# Altium PCB EVT_SYS_CARRIER.PcbDoc
Units mil, origin at the board's own origin, x right, y up, seen from the top; angles counter-clockwise.
Board outline 6000 x 4000 mil, 2 copper layers (Top Layer, Bottom Layer); 92 components, 48 nets, 525 pads, 0 vias.
Unrouted connection lines stored in the file: 100.
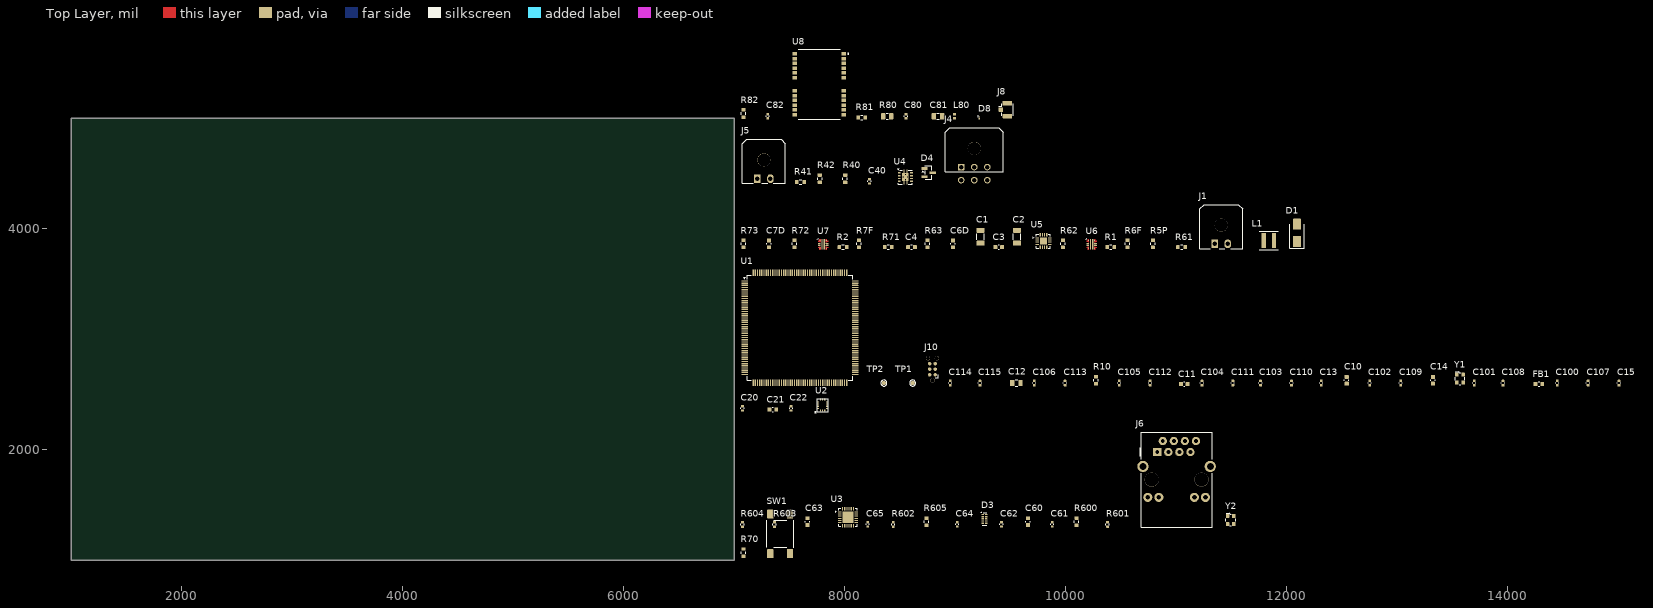
[diagram p0: Top Layer view]
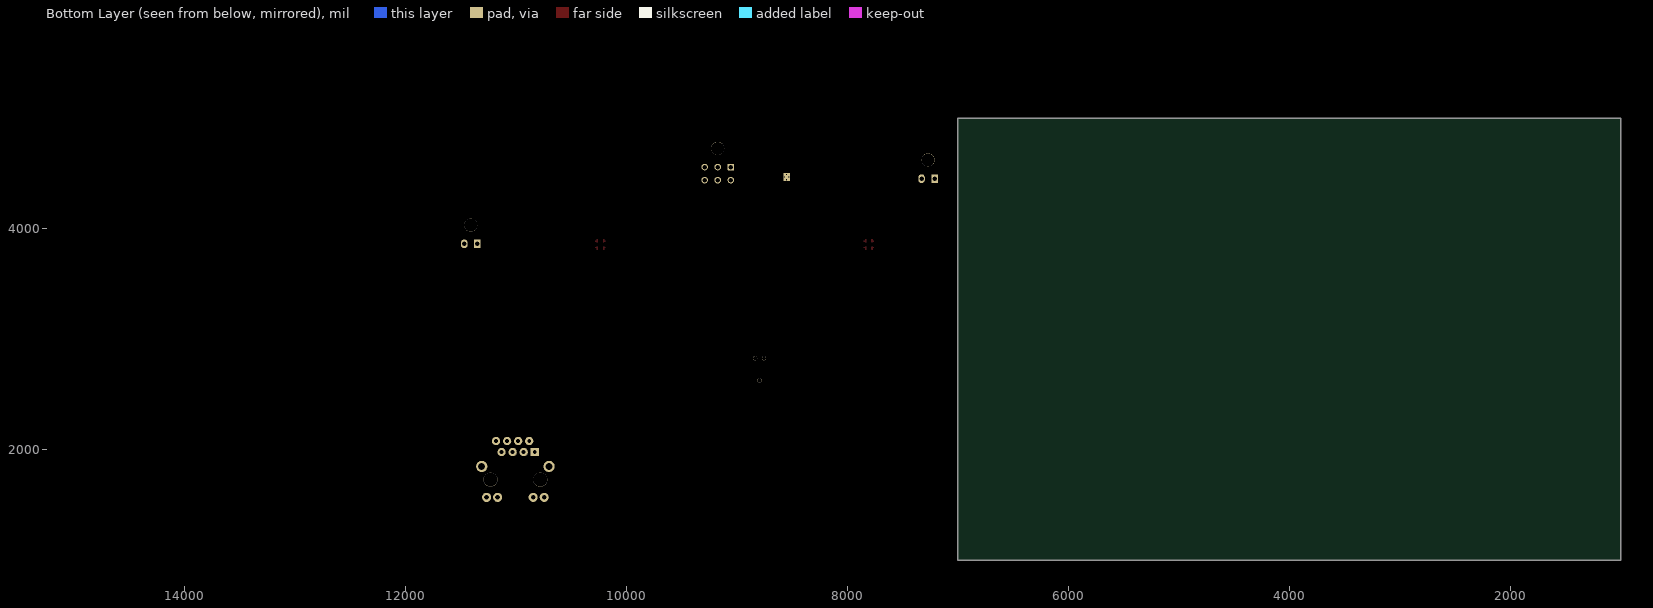
[diagram p1: Bottom Layer view, seen from below]

## Layer stack, top to bottom
Top Solder: solder mask 0.4, Solder Resist, Dk 3.5
Top Layer: signal copper 1.4
Dielectric 1: dielectric 12.6, FR-4, Dk 4.8
Bottom Layer: signal copper 1.4
Bottom Solder: solder mask 0.4, Solder Resist, Dk 3.5

## Board outline
1000,1000 7000,1000 7000,5000 1000,5000

## Design rules (kind name [scope] priority, off if disabled: settings)
Clearance [All] p1: gap=10 ignorepadtopadclearanceinfootprint=FALSE
PolygonConnect [All] p1: connectstyle=Relief reliefconductorwidth=10 reliefentries=4 polygonreliefangle="90 Angle" airgapwidth=10
RoutingVias [All] p1: holewidth=28 width=50 viastyle="Through Hole" minholewidth=28 minwidth=50 maxholewidth=28 maxwidth=50
SolderMaskExpansion [All] p1: expansion=0 istentingtop=FALSE
Width [All] p1: maxlimit=10 minlimit=10 preferedwidth=10
30 further rules are at their usual default settings.

## Classes and differential pairs
component class TIME_GNSS: C80 C81 C82 D8 J8 L80 R80 R81 R82 U8
component class RADAR_IO_CAN: C40 D4 J4 J5 R40 R41 R42 U4
component class POWER_INPUT: C1 C2 C3 C4 C6D C7D D1 J1 L1 R1 R2 R5P R6F R7F R61 R62 R63 R71 R72 R73 U5 U6 U7
component class MCU_CORE: C10 C11 C12 C13 C14 C15 C100 C101 C102 C103 C104 C105 C106 C107 C108 C109 C110 C111 C112 C113 C114 C115 FB1 J10 R10 TP1 TP2 U1 Y1
component class IMU: C20 C21 C22 U2
component class ETHERNET: C60 C61 C62 C63 C64 C65 D3 J6 R600 R601 R602 R603 R604 R605 U3 Y2
component class DEBUG_BOOT: R70 SW1

## Components (designator, comment, footprint, x,y, rotation, side; value= is the part's Value field where it differs from the comment)
C1 "10uF/25V" C_1206_3216Metric 9230,3930 r90 top
C2 "22uF/6.3V" C_1206_3216Metric 9560,3930 r90 top
C3 "3.3nF" C_0603_1608Metric 9395,3835 r0 top
C4 "100nF/25V" C_0603_1608Metric 8605,3835 r0 top
C6D "3.3nF" C_0603_1608Metric 8980,3865 r90 top
C7D "3.3nF" C_0603_1608Metric 7315,3865 r90 top
C10 "2.2uF" C_0603_1608Metric 12545,2630 r90 top
C11 "2.2uF" C_0603_1608Metric 11075,2595 r0 top
C12 "4.7uF" C_0805_2012Metric 9555,2605 r0 top
C13 "100nF" C_0402_1005Metric 12315,2605 r90 top
C14 "1uF" C_0603_1608Metric 13325,2630 r90 top
C15 "100nF" C_0402_1005Metric 15010,2605 r90 top
C20 "100nF" C_0402_1005Metric 7075,2375 r90 top
C21 "2.2uF" C_0603_1608Metric 7350,2365 r0 top
C22 "10nF" C_0402_1005Metric 7515,2375 r90 top
C40 "100nF" C_0402_1005Metric 8225,4430 r90 top
C60 "1uF" C_0603_1608Metric 9660,1350 r90 top
C61 "470pF C0G" C_0402_1005Metric 9880,1325 r90 top
C62 "100nF" C_0402_1005Metric 9420,1325 r90 top
C63 "22nF C0G" C_0603_1608Metric 7665,1350 r90 top
C64 "100nF" C_0402_1005Metric 9020,1325 r90 top
C65 "100nF" C_0402_1005Metric 8210,1325 r90 top
C80 "100nF" C_0402_1005Metric 8555,5020 r90 top
C81 "10uF" C_0805_2012Metric 8845,5020 r0 top
C82 "100nF DNP_OPTION" C_0402_1005Metric 7305,5020 r90 top
C100 "100nF VDD" C_0402_1005Metric 14450,2605 r90 top
C101 "100nF VDD" C_0402_1005Metric 13700,2605 r90 top
C102 "100nF VDD" C_0402_1005Metric 12755,2605 r90 top
C103 "100nF VDD" C_0402_1005Metric 11765,2605 r90 top
C104 "100nF VDD" C_0402_1005Metric 11235,2605 r90 top
C105 "100nF VDD" C_0402_1005Metric 10485,2605 r90 top
C106 "100nF VDD" C_0402_1005Metric 9715,2605 r90 top
C107 "100nF VDD" C_0402_1005Metric 14730,2605 r90 top
C108 "100nF VDD" C_0402_1005Metric 13960,2605 r90 top
C109 "100nF VDD" C_0402_1005Metric 13035,2605 r90 top
C110 "100nF VDD" C_0402_1005Metric 12045,2605 r90 top
C111 "100nF VDD" C_0402_1005Metric 11515,2605 r90 top
C112 "100nF VDD" C_0402_1005Metric 10765,2605 r90 top
C113 "100nF VDD" C_0402_1005Metric 9995,2605 r90 top
C114 "100nF VDD33_USB" C_0402_1005Metric 8955,2605 r90 top
C115 "100nF NRST" C_0402_1005Metric 9225,2605 r90 top
D1 "SMAJ15CA" D_SMA 12095,3965 r90 top
D3 "TPD4E05U06DQAR" USON-10_2.5x1.0mm_P0.5mm 9265,1375 r0 top
D4 "ESD2CANFD24-Q1" SOT-23 8760,4510 r0 top
D8 "ESD0P2RF-02LS" ESD0P2RF-02LS_PG-TSSLP-2-1 9220,5005 r0 top
FB1 "BLM18BD601SH1" L_0603_1608Metric 14285,2595 r0 top
J1 "12V_IN" Molex_43650-0200_RA_THT_2P 11350,3865 r0 top
J4 "RADAR_IO" Molex_43045-0600_RA_THT_6P 9055,4560 r0 top
J5 "RADAR_PWR" Molex_43650-0200_RA_THT_2P 7210,4455 r0 top
J6 "SI-60182-F" RJ45_Bel_SI-60062-F 10830,1980 r0 top
J8 "GNSS_UFL" Hirose_UFL_R_SMT_K 9455,5080 r0 top
J10 "TC2030_SWD" TagConnect_TC2030_NL 8795,2730 r90 top
L1 "2.2uH" Coilcraft_XFL4020_4x4 11840,3895 r0 top
L80 "27nH DNP_OPTION" L_0402_1005Metric 8995,5020 r90 top
R1 "665R 1%" R_0603_1608Metric 10410,3835 r0 top
R2 "1.05k 1%" R_0603_1608Metric 7985,3835 r0 top
R5P "100k 1% PG_PU" R_0603_1608Metric 10790,3865 r90 top
R6F "10k 1% FLT_PU" R_0603_1608Metric 10560,3865 r90 top
R7F "10k 1% FLT_PU" R_0603_1608Metric 8130,3865 r90 top
R10 "10k 1%" R_0603_1608Metric 10275,2630 r90 top
R40 "120R 1% DNP_DEFAULT" R_0603_1608Metric 8005,4455 r90 top
R41 "10k 1% STB_PD" R_0603_1608Metric 7600,4425 r0 top
R42 "10k 1% SHDN_PD" R_0603_1608Metric 7775,4455 r90 top
R61 "470k 1%" R_0603_1608Metric 11050,3835 r0 top
R62 "36.0k 1%" R_0603_1608Metric 9975,3865 r90 top
R63 "41.2k 1%" R_0603_1608Metric 8750,3865 r90 top
R70 "0R DNP_BOOT_OVERRIDE" R_0603_1608Metric 7085,1070 r90 top
R71 "470k 1%" R_0603_1608Metric 8395,3835 r0 top
R72 "16.9k 1%" R_0603_1608Metric 7545,3865 r90 top
R73 "43.7k 1%" R_0603_1608Metric 7085,3865 r90 top
R80 "10R 0.25W DNP_OPTION" R_0805_2012Metric 8385,5020 r0 top
R81 "100k 1% VUSB_PD" R_0603_1608Metric 8155,5010 r0 top
R82 "0R V_BCKP" R_0603_1608Metric 7085,5045 r90 top
R600 "12.1k 1%" R_0603_1608Metric 10100,1350 r90 top
R601 "49.9R 1%" R_0402_1005Metric 10380,1325 r90 top
R602 "49.9R 1%" R_0402_1005Metric 8440,1325 r90 top
R603 "49.9R 1%" R_0402_1005Metric 7365,1325 r90 top
R604 "49.9R 1%" R_0402_1005Metric 7075,1325 r90 top
R605 "10k 1% NRST_PD" R_0603_1608Metric 8740,1350 r90 top
SW1 "NRST" ESwitch_TL3301_GullWing_6x6 7415,1240 r90 top
TP1 "DEBUG_TX" TestPoint_Pad_D1.0mm 8615,2605 r0 top
TP2 "DEBUG_RX" TestPoint_Pad_D1.0mm 8355,2605 r0 top
U1 "STM32H753IIT6" LQFP-176_24x24mm_P0.5mm 7595,3105 r0 top
U2 "ICM-42688-P" ICM-42688-P_LGA14_2.5x3mm_P0.5mm 7800,2405 r0 top
U3 "LAN8742Ai-CZ-TR" QFN-24-1EP_4x4mm_P0.5mm_EP2.6x2.6mm 8030,1390 r0 top
U4 "TCAN3404DRBRQ1" Texas_DRB0008A 8550,4470 r0 top
U5 "TPS62132RGTR_3V3" VQFN-16-1EP_3x3mm_P0.5mm_EP1.68x1.68mm 9800,3890 r0 top
U6 "TPS259470ARPWR_SYS" TPS259470A_RPW0010A_VQFN-HR-10_2x2mm_P0.475mm 10235,3860 r0 top
U7 "TPS259470ARPWR_RADAR" TPS259470A_RPW0010A_VQFN-HR-10_2x2mm_P0.475mm 7805,3860 r0 top
U8 "NEO-M9N-00B" NEO-M9N_LCC24_12.2x16mm 7770,5310 r0 top
Y1 "ECS-2520S33-250-FN-TR" Oscillator_SMD_ECS_2520MV-xxx-xx-4Pin_2.5x2.0mm 13570,2645 r0 top
Y2 "ECS-2520S33-500-FN-TR" Oscillator_SMD_ECS_2520MV-xxx-xx-4Pin_2.5x2.0mm 11495,1365 r0 top

## Footprints (in the part's own frame and the unit in brackets; to place one, negate y for a bottom-side part, rotate by r counter-clockwise, add the part's x,y. Pads: shape width x height; smd on the part's side, far side on the other; paste and mask are expansions set on the pad)
C_0402_1005Metric [mm]
  rrect25% 0.56x0.62 smd: 1(-0.48,0) 2(0.48,0)
  silkscreen extent -0.11,-0.36 0.11,0.36
C_0603_1608Metric [mm]
  rrect25% 0.9x0.95 smd: 1(-0.775,0) 2(0.775,0)
  silkscreen extent -0.14,-0.51 0.14,0.51
C_0805_2012Metric [mm]
  rrect25% 1x1.45 smd: 1(-0.95,0) 2(0.95,0)
  silkscreen extent -0.26,-0.73 0.26,0.73
C_1206_3216Metric [mm]
  rrect22% 1.15x1.8 smd: 1(-1.475,0) 2(1.475,0)
  silkscreen extent -0.71,-0.91 0.71,0.91
Coilcraft_XFL4020_4x4 [mm]
  rect 0.98x3.4 smd: 1(-1.185,0) 2(1.185,0)
  silkscreen extent -2.15,-2.15 2.15,2.15
D_SMA [mm]
  rrect14% 2.5x1.8 smd: 1(-2,0) 2(2,0)
  silkscreen extent -3.51,-1.65 2,1.65
ESD0P2RF-02LS_PG-TSSLP-2-1 [mm]
  rect 0.32x0.24 smd: 1(0,0.19) 2(0,-0.19)
  silkscreen extent -0.4,0.32 -0.24,0.48
ESwitch_TL3301_GullWing_6x6 [mm]
  rrect18% 2.1x1.4 smd: 1(-4.55,2.25) 1(4.55,2.25) 2(-4.55,-2.25) 2(4.55,-2.25)
  silkscreen extent -3.1,-3.1 3.1,3.1
Hirose_UFL_R_SMT_K [mm]
  rrect25% 1.05x1 smd: 1(-1.05,0)
  rrect24% 2.2x1.05 smd: 2(0.475,-1.475) 2(0.475,1.475)
  silkscreen extent -1.52,-1.4 1.84,1.4
ICM-42688-P_LGA14_2.5x3mm_P0.5mm [mm]
  rect 0.475x0.25 smd: 1(-1.012,-0.75) 2(-1.012,-0.25) 3(-1.012,0.25) 4(-1.012,0.75) 8(1.012,0.75) 9(1.012,0.25) 10(1.012,-0.25) 11(1.012,-0.75)
  rect 0.25x0.475 smd: 5(-0.5,1.262) 6(0,1.262) 7(0.5,1.262) 12(0.5,-1.262) 13(0,-1.262) 14(-0.5,-1.262)
  silkscreen extent -1.8,-1.8 1.25,1.5
L_0402_1005Metric [mm]
  rrect25% 0.59x0.64 smd: 1(-0.485,0) 2(0.485,0)
L_0603_1608Metric [mm]
  rrect25% 0.875x0.95 smd: 1(-0.787,0) 2(0.787,0)
  silkscreen extent -0.16,-0.51 0.16,0.51
LQFP-176_24x24mm_P0.5mm [mm]
  rrect25% 1.5x0.3 smd: 1(-12.675,10.75) 2(-12.675,10.25) 3(-12.675,9.75) 4(-12.675,9.25) 5(-12.675,8.75) 6(-12.675,8.25) 7(-12.675,7.75) 8(-12.675,7.25) 9(-12.675,6.75) 10(-12.675,6.25) 11(-12.675,5.75) 12(-12.675,5.25) 13(-12.675,4.75) 14(-12.675,4.25) 15(-12.675,3.75) 16(-12.675,3.25) 17(-12.675,2.75) 18(-12.675,2.25) 19(-12.675,1.75) 20(-12.675,1.25) 21(-12.675,0.75) 22(-12.675,0.25) 23(-12.675,-0.25) 24(-12.675,-0.75) 25(-12.675,-1.25) 26(-12.675,-1.75) 27(-12.675,-2.25) 28(-12.675,-2.75) 29(-12.675,-3.25) 30(-12.675,-3.75) 31(-12.675,-4.25) 32(-12.675,-4.75) 33(-12.675,-5.25) 34(-12.675,-5.75) 35(-12.675,-6.25) 36(-12.675,-6.75) 37(-12.675,-7.25) 38(-12.675,-7.75) 39(-12.675,-8.25) 40(-12.675,-8.75) 41(-12.675,-9.25) 42(-12.675,-9.75) 43(-12.675,-10.25) 44(-12.675,-10.75) 89(12.675,-10.75) 90(12.675,-10.25) 91(12.675,-9.75) 92(12.675,-9.25) 93(12.675,-8.75) 94(12.675,-8.25) 95(12.675,-7.75) 96(12.675,-7.25) 97(12.675,-6.75) 98(12.675,-6.25) 99(12.675,-5.75) 100(12.675,-5.25) 101(12.675,-4.75) 102(12.675,-4.25) 103(12.675,-3.75) 104(12.675,-3.25) 105(12.675,-2.75) 106(12.675,-2.25) 107(12.675,-1.75) 108(12.675,-1.25) 109(12.675,-0.75) 110(12.675,-0.25) 111(12.675,0.25) 112(12.675,0.75) 113(12.675,1.25) 114(12.675,1.75) 115(12.675,2.25) 116(12.675,2.75) 117(12.675,3.25) 118(12.675,3.75) 119(12.675,4.25) 120(12.675,4.75) 121(12.675,5.25) 122(12.675,5.75) 123(12.675,6.25) 124(12.675,6.75) 125(12.675,7.25) 126(12.675,7.75) 127(12.675,8.25) 128(12.675,8.75) 129(12.675,9.25) 130(12.675,9.75) 131(12.675,10.25) 132(12.675,10.75)
  rrect25% 0.3x1.5 smd: 45(-10.75,-12.675) 46(-10.25,-12.675) 47(-9.75,-12.675) 48(-9.25,-12.675) 49(-8.75,-12.675) 50(-8.25,-12.675) 51(-7.75,-12.675) 52(-7.25,-12.675) 53(-6.75,-12.675) 54(-6.25,-12.675) 55(-5.75,-12.675) 56(-5.25,-12.675) 57(-4.75,-12.675) 58(-4.25,-12.675) 59(-3.75,-12.675) 60(-3.25,-12.675) 61(-2.75,-12.675) 62(-2.25,-12.675) 63(-1.75,-12.675) 64(-1.25,-12.675) 65(-0.75,-12.675) 66(-0.25,-12.675) 67(0.25,-12.675) 68(0.75,-12.675) 69(1.25,-12.675) 70(1.75,-12.675) 71(2.25,-12.675) 72(2.75,-12.675) 73(3.25,-12.675) 74(3.75,-12.675) 75(4.25,-12.675) 76(4.75,-12.675) 77(5.25,-12.675) 78(5.75,-12.675) 79(6.25,-12.675) 80(6.75,-12.675) 81(7.25,-12.675) 82(7.75,-12.675) 83(8.25,-12.675) 84(8.75,-12.675) 85(9.25,-12.675) 86(9.75,-12.675) 87(10.25,-12.675) 88(10.75,-12.675) 133(10.75,12.675) 134(10.25,12.675) 135(9.75,12.675) 136(9.25,12.675) 137(8.75,12.675) 138(8.25,12.675) 139(7.75,12.675) 140(7.25,12.675) 141(6.75,12.675) 142(6.25,12.675) 143(5.75,12.675) 144(5.25,12.675) 145(4.75,12.675) 146(4.25,12.675) 147(3.75,12.675) 148(3.25,12.675) 149(2.75,12.675) 150(2.25,12.675) 151(1.75,12.675) 152(1.25,12.675) 153(0.75,12.675) 154(0.25,12.675) 155(-0.25,12.675) 156(-0.75,12.675) 157(-1.25,12.675) 158(-1.75,12.675) 159(-2.25,12.675) 160(-2.75,12.675) 161(-3.25,12.675) 162(-3.75,12.675) 163(-4.25,12.675) 164(-4.75,12.675) 165(-5.25,12.675) 166(-5.75,12.675) 167(-6.25,12.675) 168(-6.75,12.675) 169(-7.25,12.675) 170(-7.75,12.675) 171(-8.25,12.675) 172(-8.75,12.675) 173(-9.25,12.675) 174(-9.75,12.675) 175(-10.25,12.675) 176(-10.75,12.675)
  silkscreen extent -13.09,-12.11 12.11,12.11
Molex_43045-0600_RA_THT_6P [mm]
  rrect17% 1.5x1.5 hole 1.02: 1(0,0)
  round 1.5 hole 1.02: 2(3,0) 3(6,0) 4(0,-3) 5(3,-3) 6(6,-3)
  round 3 hole 3: Un1(3,4.32)
  silkscreen extent -3.68,-1.1 9.68,9.03
Molex_43650-0200_RA_THT_2P [mm]
  rrect17% 1.5x2.02 hole 1.02: 1(0,0)
  rrect100% 1.5x2.02 hole 1.02: 2(3,0)
  round 3 hole 3: Un1(1.5,4.32)
  silkscreen extent -3.43,-1.09 6.44,9.03
NEO-M9N_LCC24_12.2x16mm [mm]
  rect 1x0.8 smd: 1(5.6,7) 2(5.6,5.9) 3(5.6,4.8) 4(5.6,3.7) 5(5.6,2.6) 6(5.6,1.5) 7(5.6,-1.5) 8(5.6,-2.6) 9(5.6,-3.7) 10(5.6,-4.8) 11(5.6,-5.9) 12(5.6,-7) 13(-5.6,-7) 14(-5.6,-5.9) 15(-5.6,-4.8) 16(-5.6,-3.7) 17(-5.6,-2.6) 18(-5.6,-1.5) 19(-5.6,1.5) 20(-5.6,2.6) 21(-5.6,3.7) 22(-5.6,4.8) 23(-5.6,5.9) 24(-5.6,7)
  silkscreen extent -4.8,-8 6.8,8
Oscillator_SMD_ECS_2520MV-xxx-xx-4Pin_2.5x2.0mm [mm]
  rrect25% 0.8x0.9 smd: 1(-0.725,0.925) 2(-0.725,-0.925) 3(0.725,-0.925) 4(0.725,0.925)
  silkscreen extent -1.11,-1.36 1.11,1.56
QFN-24-1EP_4x4mm_P0.5mm_EP2.6x2.6mm [mm]
  rrect25% 0.825x0.25 smd: 1(-1.937,1.25) 2(-1.937,0.75) 3(-1.937,0.25) 4(-1.937,-0.25) 5(-1.937,-0.75) 6(-1.937,-1.25) 13(1.937,-1.25) 14(1.937,-0.75) 15(1.937,-0.25) 16(1.937,0.25) 17(1.937,0.75) 18(1.937,1.25)
  rrect25% 0.25x0.825 smd: 7(-1.25,-1.937) 8(-0.75,-1.937) 9(-0.25,-1.937) 10(0.25,-1.937) 11(0.75,-1.937) 12(1.25,-1.937) 19(1.25,1.937) 20(0.75,1.937) 21(0.25,1.937) 22(-0.25,1.937) 23(-0.75,1.937) 24(-1.25,1.937)
  rect 2.6x2.6 smd: 25(0,0)
  rrect24% 1.05x1.05 on Top Paste: Un1(-0.65,0.65) Un2(-0.65,-0.65) Un3(0.65,0.65) Un4(0.65,-0.65)
  silkscreen extent -2.94,-2.11 2.11,2.11
R_0402_1005Metric [mm]
  rrect25% 0.54x0.64 smd: 1(-0.51,0) 2(0.51,0)
  silkscreen extent -0.15,-0.38 0.15,0.38
R_0603_1608Metric [mm]
  rrect25% 0.8x0.95 smd: 1(-0.825,0) 2(0.825,0)
  silkscreen extent -0.24,-0.52 0.24,0.52
R_0805_2012Metric [mm]
  rrect24% 1.025x1.4 smd: 1(-0.913,0) 2(0.913,0)
  silkscreen extent -0.23,-0.73 0.23,0.73
RJ45_Bel_SI-60062-F [mm]
  rect 1.9x1.9 hole 0.9: 1(0,0)
  round 1.9 hole 0.9: 2(1.27,2.54) 3(2.54,0) 4(3.81,2.54) 5(5.08,0) 6(6.35,2.54) 7(7.62,0) 8(8.89,2.54)
  round 2.1 hole 1.1: L1(-2.18,-10.41) L2(0.36,-10.41) L3(8.53,-10.41) L4(11.07,-10.41)
  round 2.6 hole 1.6: SH(-3.3,-3.3) SH(12.19,-3.3)
  round 3.25 hole 3.25: Un1(-1.27,-6.35) Un2(10.16,-6.35)
  silkscreen extent -3.92,-17.24 12.62,4.55
SOT-23 [mm]
  rrect25% 1.475x0.6 smd: 1(-0.937,0.95) 2(-0.937,-0.95) 3(0.937,0)
  silkscreen extent -1.54,-1.56 0.76,1.56
TagConnect_TC2030_NL [mil]
  round 31 smd: 1(-50,-25) 2(-50,25) 3(0,-25) 4(0,25) 5(50,-25) 6(50,25)
  round 39 hole 39: Un1(-100,0) Un2(100,40) Un3(100,-40)
  silkscreen extent -75,-50 -50,-25
TestPoint_Pad_D1.0mm [mm]
  round 1 smd: 1(0,0)
  silkscreen extent -0.7,-0.7 0.7,0.7
Texas_DRB0008A [mm]
  rrect16% 0.6x0.31 smd: 1(-1.4,0.975) 2(-1.4,0.325) 3(-1.4,-0.325) 4(-1.4,-0.975) 5(1.4,-0.975) 6(1.4,-0.325) 7(1.4,0.325) 8(1.4,0.975)
  round 0.5 hole 0.2: 9(-0.5,0) 9(0,-0.625) 9(0,0.625) 9(0.5,0)
  rrect22% 0.23x1.025 smd: 9(-0.325,-1.188) 9(-0.325,1.188) 9(0.325,-1.188) 9(0.325,1.188)
  rrect3% 1.5x1.75 smd: 9(0,0)
  rrect3% 1.5x1.75 smd far side: 9(0,0)
  rrect22% 0.23x0.725 on Top Paste: Un1(-0.325,1.337) Un2(-0.325,-1.337) Un4(0.325,1.337) Un5(0.325,-1.337)
  rrect4% 1.34x1.55 on Top Paste: Un3(0,0)
  silkscreen extent -1.85,-1.61 1.61,1.94
TPS259470A_RPW0010A_VQFN-HR-10_2x2mm_P0.475mm [mm]
  round 0.25 smd: 1(-0.725,0.875) 4(-0.725,-0.875) 7(0.725,-0.875) 10(0.725,0.875)
  rrect17% 0.6x0.3 smd: 2(-0.9,0.225) 3(-0.9,-0.225) 8(0.9,-0.225) 9(0.9,0.225)
  rrect17% 0.3x2.4 smd: 5(-0.25,0) 6(0.25,0)
  rrect17% 0.3x1.05 on Top Paste: Un1(-0.25,0.675) Un2(-0.25,-0.675) Un3(0.25,0.675) Un4(0.25,-0.675)
  Top Layer region: 0.8,0.8 1.15,0.8 1.15,0.6 0.65,0.6 0.65,1.15 0.8,1.15
  Top Layer region: 0.819,1.196 0.835,1.185 0.846,1.169 0.85,1.15 0.85,0.6 0.846,0.581 0.835,0.565 0.819,0.554 0.8,0.55 0.65,0.55 0.631,0.554 0.615,0.565 0.604,0.581 0.6,0.6 0.6,1.15 0.604,1.169 0.615,1.185 0.631,1.196 0.65,1.2 0.8,1.2
  Top Layer region: 1.15,-0.8 0.8,-0.8 0.8,-1.15 0.65,-1.15 0.65,-0.6 1.15,-0.6
  Top Layer region: 0.819,-0.554 0.835,-0.565 0.846,-0.581 0.85,-0.6 0.85,-1.15 0.846,-1.169 0.835,-1.185 0.819,-1.196 0.8,-1.2 0.65,-1.2 0.631,-1.196 0.615,-1.185 0.604,-1.169 0.6,-1.15 0.6,-0.6 0.604,-0.581 0.615,-0.565 0.631,-0.554 0.65,-0.55 0.8,-0.55
  Top Layer region: -0.65,-1.15 -0.8,-1.15 -0.8,-0.8 -1.15,-0.8 -1.15,-0.6 -0.65,-0.6
  Top Layer region: -0.631,-0.554 -0.615,-0.565 -0.604,-0.581 -0.6,-0.6 -0.6,-1.15 -0.604,-1.169 -0.615,-1.185 -0.631,-1.196 -0.65,-1.2 -0.8,-1.2 -0.819,-1.196 -0.835,-1.185 -0.846,-1.169 -0.85,-1.15 -0.85,-0.6 -0.846,-0.581 -0.835,-0.565 -0.819,-0.554 -0.8,-0.55 -0.65,-0.55
  Top Layer region: -0.65,0.6 -1.15,0.6 -1.15,0.8 -0.8,0.8 -0.8,1.15 -0.65,1.15
  Top Layer region: -0.631,1.196 -0.615,1.185 -0.604,1.169 -0.6,1.15 -0.6,0.6 -0.604,0.581 -0.615,0.565 -0.631,0.554 -0.65,0.55 -0.8,0.55 -0.819,0.554 -0.835,0.565 -0.846,0.581 -0.85,0.6 -0.85,1.15 -0.846,1.169 -0.835,1.185 -0.819,1.196 -0.8,1.2 -0.65,1.2
  silkscreen extent -1.43,1.15 -1.15,1.43
USON-10_2.5x1.0mm_P0.5mm [mm]
  rrect25% 0.55x0.3 smd: 1(-0.385,1) 2(-0.385,0.5) 3(-0.385,0) 4(-0.385,-0.5) 5(-0.385,-1) 6(0.385,-1) 7(0.385,-0.5) 8(0.385,0) 9(0.385,0.5) 10(0.385,1)
  silkscreen extent -0.9,-1.41 0.5,1.69
VQFN-16-1EP_3x3mm_P0.5mm_EP1.68x1.68mm [mm]
  rrect25% 0.825x0.25 smd: 1(-1.462,0.75) 2(-1.462,0.25) 3(-1.462,-0.25) 4(-1.462,-0.75) 9(1.462,-0.75) 10(1.462,-0.25) 11(1.462,0.25) 12(1.462,0.75)
  rrect25% 0.25x0.825 smd: 5(-0.75,-1.462) 6(-0.25,-1.462) 7(0.25,-1.462) 8(0.75,-1.462) 13(0.75,1.462) 14(0.25,1.462) 15(-0.25,1.462) 16(-0.75,1.462)
  rect 1.68x1.68 smd: 17(0,0)
  rrect25% 0.68x0.68 on Top Paste: Un1(-0.42,0.42) Un2(-0.42,-0.42) Un3(0.42,0.42) Un4(0.42,-0.42)
  silkscreen extent -2.47,-1.61 1.61,1.61

## Part data
C1 C2 C3 C4 C6D C7D C10 C11 C12 C13 C14 C15 C20 C21 C22 C40 C60 C61 C62 C63 C64 C65 C80 C81 C82 C100 C101 C102 C103 C104 C105 C106 C107 C108 C109 C110 C111 C112 C113 C114 C115: library part C
  C1 C2 C3 C4 C6D C7D: hierarchy_path=/ce42a7d8-d182-40f3-bc2c-aa0d4229bdd9/64a253d9-a387-4f52-9f0e-abac505f3e3e
  C10 C11 C12 C13 C14 C15: hierarchy_path=/ce42a7d8-d182-40f3-bc2c-aa0d4229bdd9/8b37b92b-f356-47f9-820d-2c2fc18432a1
  C20 C21 C22: hierarchy_path=/ce42a7d8-d182-40f3-bc2c-aa0d4229bdd9/1ea02f5b-93d3-4b69-ad39-2730dedea010
  C40: hierarchy_path=/ce42a7d8-d182-40f3-bc2c-aa0d4229bdd9/fb89b181-0bfc-4c93-8688-482517ca26dd
  C60 C61 C63: hierarchy_path=/ce42a7d8-d182-40f3-bc2c-aa0d4229bdd9/c8e1f423-5a5c-4c5d-a76c-95c447be020b
  C62: Decouples_U3_Pin=1, hierarchy_path=/ce42a7d8-d182-40f3-bc2c-aa0d4229bdd9/c8e1f423-5a5c-4c5d-a76c-95c447be020b
  C64: Decouples_U3_Pin=9, hierarchy_path=/ce42a7d8-d182-40f3-bc2c-aa0d4229bdd9/c8e1f423-5a5c-4c5d-a76c-95c447be020b
  C65: Decouples_U3_Pin=19, hierarchy_path=/ce42a7d8-d182-40f3-bc2c-aa0d4229bdd9/c8e1f423-5a5c-4c5d-a76c-95c447be020b
  C80 C81 C82: hierarchy_path=/ce42a7d8-d182-40f3-bc2c-aa0d4229bdd9/8677fbc4-584c-46f5-8d0d-bbccc276654b
  C100: Decouples_U1_Pin=15, hierarchy_path=/ce42a7d8-d182-40f3-bc2c-aa0d4229bdd9/8b37b92b-f356-47f9-820d-2c2fc18432a1
  C101: Decouples_U1_Pin=23, hierarchy_path=/ce42a7d8-d182-40f3-bc2c-aa0d4229bdd9/8b37b92b-f356-47f9-820d-2c2fc18432a1
  C102: Decouples_U1_Pin=36, hierarchy_path=/ce42a7d8-d182-40f3-bc2c-aa0d4229bdd9/8b37b92b-f356-47f9-820d-2c2fc18432a1
  C103: Decouples_U1_Pin=49, hierarchy_path=/ce42a7d8-d182-40f3-bc2c-aa0d4229bdd9/8b37b92b-f356-47f9-820d-2c2fc18432a1
  C104: Decouples_U1_Pin=62, hierarchy_path=/ce42a7d8-d182-40f3-bc2c-aa0d4229bdd9/8b37b92b-f356-47f9-820d-2c2fc18432a1
  C105: Decouples_U1_Pin=72, hierarchy_path=/ce42a7d8-d182-40f3-bc2c-aa0d4229bdd9/8b37b92b-f356-47f9-820d-2c2fc18432a1
  C106: Decouples_U1_Pin=82, hierarchy_path=/ce42a7d8-d182-40f3-bc2c-aa0d4229bdd9/8b37b92b-f356-47f9-820d-2c2fc18432a1
  C107: Decouples_U1_Pin=91, hierarchy_path=/ce42a7d8-d182-40f3-bc2c-aa0d4229bdd9/8b37b92b-f356-47f9-820d-2c2fc18432a1
  C108: Decouples_U1_Pin=103, hierarchy_path=/ce42a7d8-d182-40f3-bc2c-aa0d4229bdd9/8b37b92b-f356-47f9-820d-2c2fc18432a1
  C109: Decouples_U1_Pin=127, hierarchy_path=/ce42a7d8-d182-40f3-bc2c-aa0d4229bdd9/8b37b92b-f356-47f9-820d-2c2fc18432a1
  C110: Decouples_U1_Pin=136, hierarchy_path=/ce42a7d8-d182-40f3-bc2c-aa0d4229bdd9/8b37b92b-f356-47f9-820d-2c2fc18432a1
  C111: Decouples_U1_Pin=149, hierarchy_path=/ce42a7d8-d182-40f3-bc2c-aa0d4229bdd9/8b37b92b-f356-47f9-820d-2c2fc18432a1
  C112: Decouples_U1_Pin=159, hierarchy_path=/ce42a7d8-d182-40f3-bc2c-aa0d4229bdd9/8b37b92b-f356-47f9-820d-2c2fc18432a1
  C113: Decouples_U1_Pin=172, hierarchy_path=/ce42a7d8-d182-40f3-bc2c-aa0d4229bdd9/8b37b92b-f356-47f9-820d-2c2fc18432a1
  C114: Decouples_U1_Pin=114, hierarchy_path=/ce42a7d8-d182-40f3-bc2c-aa0d4229bdd9/8b37b92b-f356-47f9-820d-2c2fc18432a1
  C115: Filters_U1_Pin=31, hierarchy_path=/ce42a7d8-d182-40f3-bc2c-aa0d4229bdd9/8b37b92b-f356-47f9-820d-2c2fc18432a1
D1 D8: library part D_TVS
  D1: hierarchy_path=/ce42a7d8-d182-40f3-bc2c-aa0d4229bdd9/64a253d9-a387-4f52-9f0e-abac505f3e3e
  D8: hierarchy_path=/ce42a7d8-d182-40f3-bc2c-aa0d4229bdd9/8677fbc4-584c-46f5-8d0d-bbccc276654b, MPN=ESD0P2RF-02LS
D4: library part ESD2CANFD24DBZRQ1, Capture_Status=LOCAL_CONTRACT_SYMBOL, hierarchy_path=/ce42a7d8-d182-40f3-bc2c-aa0d4229bdd9/fb89b181-0bfc-4c93-8688-482517ca26dd, MPN=ESD2CANFD24DBZRQ1
FB1: library part L_Ferrite, hierarchy_path=/ce42a7d8-d182-40f3-bc2c-aa0d4229bdd9/8b37b92b-f356-47f9-820d-2c2fc18432a1, MPN=BLM18BD601SH1
J1 J5 J8: library part Conn_01x02
  J1: hierarchy_path=/ce42a7d8-d182-40f3-bc2c-aa0d4229bdd9/64a253d9-a387-4f52-9f0e-abac505f3e3e
  J5: hierarchy_path=/ce42a7d8-d182-40f3-bc2c-aa0d4229bdd9/fb89b181-0bfc-4c93-8688-482517ca26dd
  J8: hierarchy_path=/ce42a7d8-d182-40f3-bc2c-aa0d4229bdd9/8677fbc4-584c-46f5-8d0d-bbccc276654b
J4 J10: library part Conn_01x06
  J4: hierarchy_path=/ce42a7d8-d182-40f3-bc2c-aa0d4229bdd9/fb89b181-0bfc-4c93-8688-482517ca26dd
  J10: hierarchy_path=/ce42a7d8-d182-40f3-bc2c-aa0d4229bdd9/8b37b92b-f356-47f9-820d-2c2fc18432a1
J6: library part RJ45_Bel_SI-60062-F, Compatibility_Basis=Bel_SI-60182-F_vs_SI-60062-F_verified, hierarchy_path=/ce42a7d8-d182-40f3-bc2c-aa0d4229bdd9/c8e1f423-5a5c-4c5d-a76c-95c447be020b, MPN=SI-60182-F
L1 L80: library part L
  L1: hierarchy_path=/ce42a7d8-d182-40f3-bc2c-aa0d4229bdd9/64a253d9-a387-4f52-9f0e-abac505f3e3e
  L80: hierarchy_path=/ce42a7d8-d182-40f3-bc2c-aa0d4229bdd9/8677fbc4-584c-46f5-8d0d-bbccc276654b
R1 R2 R5P R6F R7F R10 R40 R41 R42 R61 R62 R63 R70 R71 R72 R73 R80 R81 R82 R600 R601 R602 R603 R604 R605: library part R
  R1 R2 R5P R6F R7F R61 R62 R63 R71 R72 R73: hierarchy_path=/ce42a7d8-d182-40f3-bc2c-aa0d4229bdd9/64a253d9-a387-4f52-9f0e-abac505f3e3e
  R10: hierarchy_path=/ce42a7d8-d182-40f3-bc2c-aa0d4229bdd9/8b37b92b-f356-47f9-820d-2c2fc18432a1
  R40 R41 R42: hierarchy_path=/ce42a7d8-d182-40f3-bc2c-aa0d4229bdd9/fb89b181-0bfc-4c93-8688-482517ca26dd
  R70: hierarchy_path=/ce42a7d8-d182-40f3-bc2c-aa0d4229bdd9/f4a9ecaf-7240-419f-ae3f-f82f8c6944a3
  R80 R81 R82: hierarchy_path=/ce42a7d8-d182-40f3-bc2c-aa0d4229bdd9/8677fbc4-584c-46f5-8d0d-bbccc276654b
  R600 R601 R602 R603 R604 R605: hierarchy_path=/ce42a7d8-d182-40f3-bc2c-aa0d4229bdd9/c8e1f423-5a5c-4c5d-a76c-95c447be020b
SW1: library part SW_Push, hierarchy_path=/ce42a7d8-d182-40f3-bc2c-aa0d4229bdd9/f4a9ecaf-7240-419f-ae3f-f82f8c6944a3
TP1 TP2: library part TestPoint, hierarchy_path=/ce42a7d8-d182-40f3-bc2c-aa0d4229bdd9/8b37b92b-f356-47f9-820d-2c2fc18432a1
U1: library part STM32H753IITx, hierarchy_path=/ce42a7d8-d182-40f3-bc2c-aa0d4229bdd9/8b37b92b-f356-47f9-820d-2c2fc18432a1, MPN=STM32H753IIT6
U3: library part LAN8742A, hierarchy_path=/ce42a7d8-d182-40f3-bc2c-aa0d4229bdd9/c8e1f423-5a5c-4c5d-a76c-95c447be020b, MPN=LAN8742Ai-CZ-TR
U5: library part TPS62132RGTR, Capture_Status=LOCAL_CONTRACT_SYMBOL, hierarchy_path=/ce42a7d8-d182-40f3-bc2c-aa0d4229bdd9/64a253d9-a387-4f52-9f0e-abac505f3e3e, MPN=TPS62132RGTR
U6 U7: library part TPS259470ARPWR, Capture_Status=LOCAL_CONTRACT_SYMBOL, hierarchy_path=/ce42a7d8-d182-40f3-bc2c-aa0d4229bdd9/64a253d9-a387-4f52-9f0e-abac505f3e3e, MPN=TPS259470ARPWR
U8: library part NEO-M9N, hierarchy_path=/ce42a7d8-d182-40f3-bc2c-aa0d4229bdd9/8677fbc4-584c-46f5-8d0d-bbccc276654b, MPN=NEO-M9N-00B
D3: Capture_Status=LOCAL_CONTRACT_SYMBOL, hierarchy_path=/ce42a7d8-d182-40f3-bc2c-aa0d4229bdd9/c8e1f423-5a5c-4c5d-a76c-95c447be020b, MPN=TPD4E05U06DQAR
U2: Capture_Status=LOCAL_CONTRACT_SYMBOL, hierarchy_path=/ce42a7d8-d182-40f3-bc2c-aa0d4229bdd9/1ea02f5b-93d3-4b69-ad39-2730dedea010, MPN=ICM-42688-P
U4: Capture_Status=LOCAL_CONTRACT_SYMBOL, hierarchy_path=/ce42a7d8-d182-40f3-bc2c-aa0d4229bdd9/fb89b181-0bfc-4c93-8688-482517ca26dd, MPN=TCAN3404DRBRQ1
Y1: Capture_Status=LOCAL_CONTRACT_SYMBOL, hierarchy_path=/ce42a7d8-d182-40f3-bc2c-aa0d4229bdd9/8b37b92b-f356-47f9-820d-2c2fc18432a1, MPN=ECS-2520S33-250-FN-TR
Y2: Capture_Status=LOCAL_CONTRACT_SYMBOL, hierarchy_path=/ce42a7d8-d182-40f3-bc2c-aa0d4229bdd9/c8e1f423-5a5c-4c5d-a76c-95c447be020b, MPN=ECS-2520S33-500-FN-TR

## Nets (pads, with @x,y where several pads share a name; then routed paths per layer and width w, separated by ;. In a path a pad name is that pad's centre, name@x,y a point inside that pad or via, vN(x,y) a via of type N, cw(c..) or ccw(c..) an arc to the next point about the centre after c; other vN are vias at no path point)
3V3: C62.2 U3.1 U3.5 U3.7 U3.8 U3.11 U3.12 U3.13 U3.15 U3.16 U3.17 U3.18
BOOT0: R10.1
BUCK_SW: L1.1 U5.1 U5.2 U5.3
DEBUG_RX: TP2.1 U1.150
DEBUG_TX: TP1.1 U1.147
ETH_50M: Y2.3
ETH_CT: C63.1 J6.2 J6.5
ETH_NRST: R605.1
ETH_RXN: D3.5 J6.6 R604.1 U3.22
ETH_RXP: D3.4 J6.4 R603.1 U3.23
ETH_TXN: D3.2 J6.3 R602.1 U3.20
ETH_TXP: D3.1 J6.1 R601.1 U3.21
GND: C60.2 C61.2 C63.2 C64.2 C65.2 D3.3 D3.8 R600.2 R605.2 U3.25 Y2.2
GNSS_BCKP_LOCAL: R82.1 U8.22
GNSS_BIAS_FILTER: C82.1 L80.1 R80.2
GNSS_RF: D8.1 J8.1 L80.2 U8.11
GNSS_VCC_RF: R80.1 U8.9
GNSS_VUSB_LOCAL: R81.1 U8.7
MCU_HSE_25M: U1.29 Y1.3
NetC60_1: C60.1 U3.6
NetJ6_8: J6.8 J6.SH
NetR41_1: R41.1 U4.8
NetR42_1: R42.1 U4.5
NetR600_1: R600.1 U3.24
NRST: C115.1
RADAR_12V: J4.4 J5.1 U4.1 U4.2 U4.3 U4.4
RADAR_CANH: D4.1 J4.3 R40.1 U4.7
RADAR_CANL: D4.2 J4.1 R40.2 U4.6
RADAR_EFUSE_FLT: R7F.1
SWCLK: J10.4 U1.137
SWDIO: J10.2 U1.124
SWO: J10.6 U1.161
SYS_EFUSE_FLT: R6F.1
U5_PG: R5P.1 U5.4
U5_SS_LOCAL: C3.1 U5.9
U6_DVDT: C6D.1 U6.7
U6_ILIM_LOCAL: R1.1 U6.9
U6_OVLO_LOCAL: R62.2 R63.1 U6.2
U6_UVLO_LOCAL: R61.2 R62.1 U6.1
U7_DVDT: C7D.1 U7.7
U7_ILIM_LOCAL: R2.1 U7.9
U7_OVLO_LOCAL: R72.2 R73.1 U7.2
U7_UVLO_LOCAL: R71.2 R72.1 U7.1
VCAP1_LOCAL: C10.1 U1.81
VCAP2_LOCAL: C11.1 U1.125
VDDA_FILTERED: C13.1 C14.1 FB1.2 U1.38 U1.39
VIN_PROTECTED: C1.1 C4.1 R71.1 U5.10 U5.11 U5.12 U5.13 U6.6 U7.5
VIN_RAW: D1.1 J1.1 R61.1 U6.5
pads on no net: C1.2 C2.1 C2.2 C3.2 C4.2 C6D.2 C7D.2 C10.2 C11.2 C12.1 C12.2 C13.2 C14.2 C15.1 C15.2 C20.1 C20.2 C21.1 C21.2 C22.1 C22.2 C40.1 C40.2 C61.1 C62.1 C64.1 C65.1 C80.1 C80.2 C81.1 C81.2 C82.2 C100.1 C100.2 C101.1 C101.2 C102.1 C102.2 C103.1 C103.2 C104.1 C104.2 C105.1 C105.2 C106.1 C106.2 C107.1 C107.2 C108.1 C108.2 C109.1 C109.2 C110.1 C110.2 C111.1 C111.2 C112.1 C112.2 C113.1 C113.2 C114.1 C114.2 C115.2 D1.2 D3.6 D3.7 D3.9 D3.10 D4.3 D8.2 FB1.1 J1.2 J1.Un1 J4.2 J4.5 J4.6 J4.Un1 J5.2 J5.Un1 J6.7 J6.L1 J6.L2 J6.L3 J6.L4 J6.Un1 J6.Un2 J8.2 J10.1 J10.3 J10.5 J10.Un1 J10.Un2 J10.Un3 L1.2 R1.2 R2.2 R5P.2 R6F.2 R7F.2 R10.2 R41.2 R42.2 R63.2 R70.1 R70.2 R73.2 R81.2 R82.2 R601.2 R602.2 R603.2 R604.2 SW1.1 SW1.2 U1.1 U1.2 U1.3 U1.4 U1.5 U1.6 U1.7 U1.8 U1.9 U1.10 U1.11 U1.12 U1.13 U1.14 U1.15 U1.16 U1.17 U1.18 U1.19 U1.20 U1.21 U1.22 U1.23 U1.24 U1.25 U1.26 U1.27 U1.28 U1.30 U1.31 U1.32 U1.33 U1.34 U1.35 U1.36 U1.37 U1.40 U1.41 U1.42 U1.43 U1.44 U1.45 U1.46 U1.47 U1.48 U1.49 U1.50 U1.51 U1.52 U1.53 U1.54 U1.55 U1.56 U1.57 U1.58 U1.59 U1.60 U1.61 U1.62 U1.63 U1.64 U1.65 U1.66 U1.67 U1.68 U1.69 U1.70 U1.71 U1.72 U1.73 U1.74 U1.75 U1.76 U1.77 U1.78 U1.79 U1.80 U1.82 U1.83 U1.84 U1.85 U1.86 U1.87 U1.88 U1.89 U1.90 U1.91 U1.92 U1.93 U1.94 U1.95 U1.96 U1.97 U1.98 U1.99 U1.100 U1.101 U1.102 U1.103 U1.104 U1.105 U1.106 U1.107 U1.108 U1.109 U1.110 U1.111 U1.112 U1.113 U1.114 U1.115 U1.116 U1.117 U1.118 U1.119 U1.120 U1.121 U1.122 U1.123 U1.126 U1.127 U1.128 U1.129 U1.130 U1.131 U1.132 U1.133 U1.134 U1.135 U1.136 U1.138 U1.139 U1.140 U1.141 U1.142 U1.143 U1.144 U1.145 U1.146 U1.148 U1.149 U1.151 U1.152 U1.153 U1.154 U1.155 U1.156 U1.157 U1.158 U1.159 U1.160 U1.162 U1.163 U1.164 U1.165 U1.166 U1.167 U1.168 U1.169 U1.170 U1.171 U1.172 U1.173 U1.174 U1.175 U1.176 U2.1 U2.2 U2.3 U2.4 U2.5 U2.6 U2.7 U2.8 U2.9 U2.10 U2.11 U2.12 U2.13 U2.14 U3.2 U3.3 U3.4 U3.9 U3.10 U3.14 U3.19 U3.Un1 U3.Un2 U3.Un3 U3.Un4 U4.9 U4.Un1 U4.Un2 U4.Un3 U4.Un4 U4.Un5 U5.5 U5.6 U5.7 U5.8 U5.14 U5.15 U5.16 U5.17 U5.Un1 U5.Un2 U5.Un3 U5.Un4 U6.3 U6.4 U6.8 U6.10 U6.Un1 U6.Un2 U6.Un3 U6.Un4 U7.3 U7.4 U7.6 U7.8 U7.10 U7.Un1 U7.Un2 U7.Un3 U7.Un4 U8.1 U8.2 U8.3 U8.4 U8.5 U8.6 U8.8 U8.10 U8.12 U8.13 U8.14 U8.15 U8.16 U8.17 U8.18 U8.19 U8.20 U8.21 U8.23 U8.24 Y1.1 Y1.2 Y1.4 Y2.1 Y2.4

## Text inside footprints (layer, text, board x,y; h text height)
J10: Mechanical 7 "KEEPOUT" at 8805.63,2680.35 h15.75 r90